# Altium PCB LoRaWAN_v2.0.PcbDoc
Units mm, origin at the board's own origin, x right, y up, seen from the top; angles counter-clockwise.
Board outline 33 x 53 mm, 2 copper layers (Top Layer, Bottom Layer), stack 0.97 mm thick; 7 components, 16 nets, 83 pads, 59 vias.
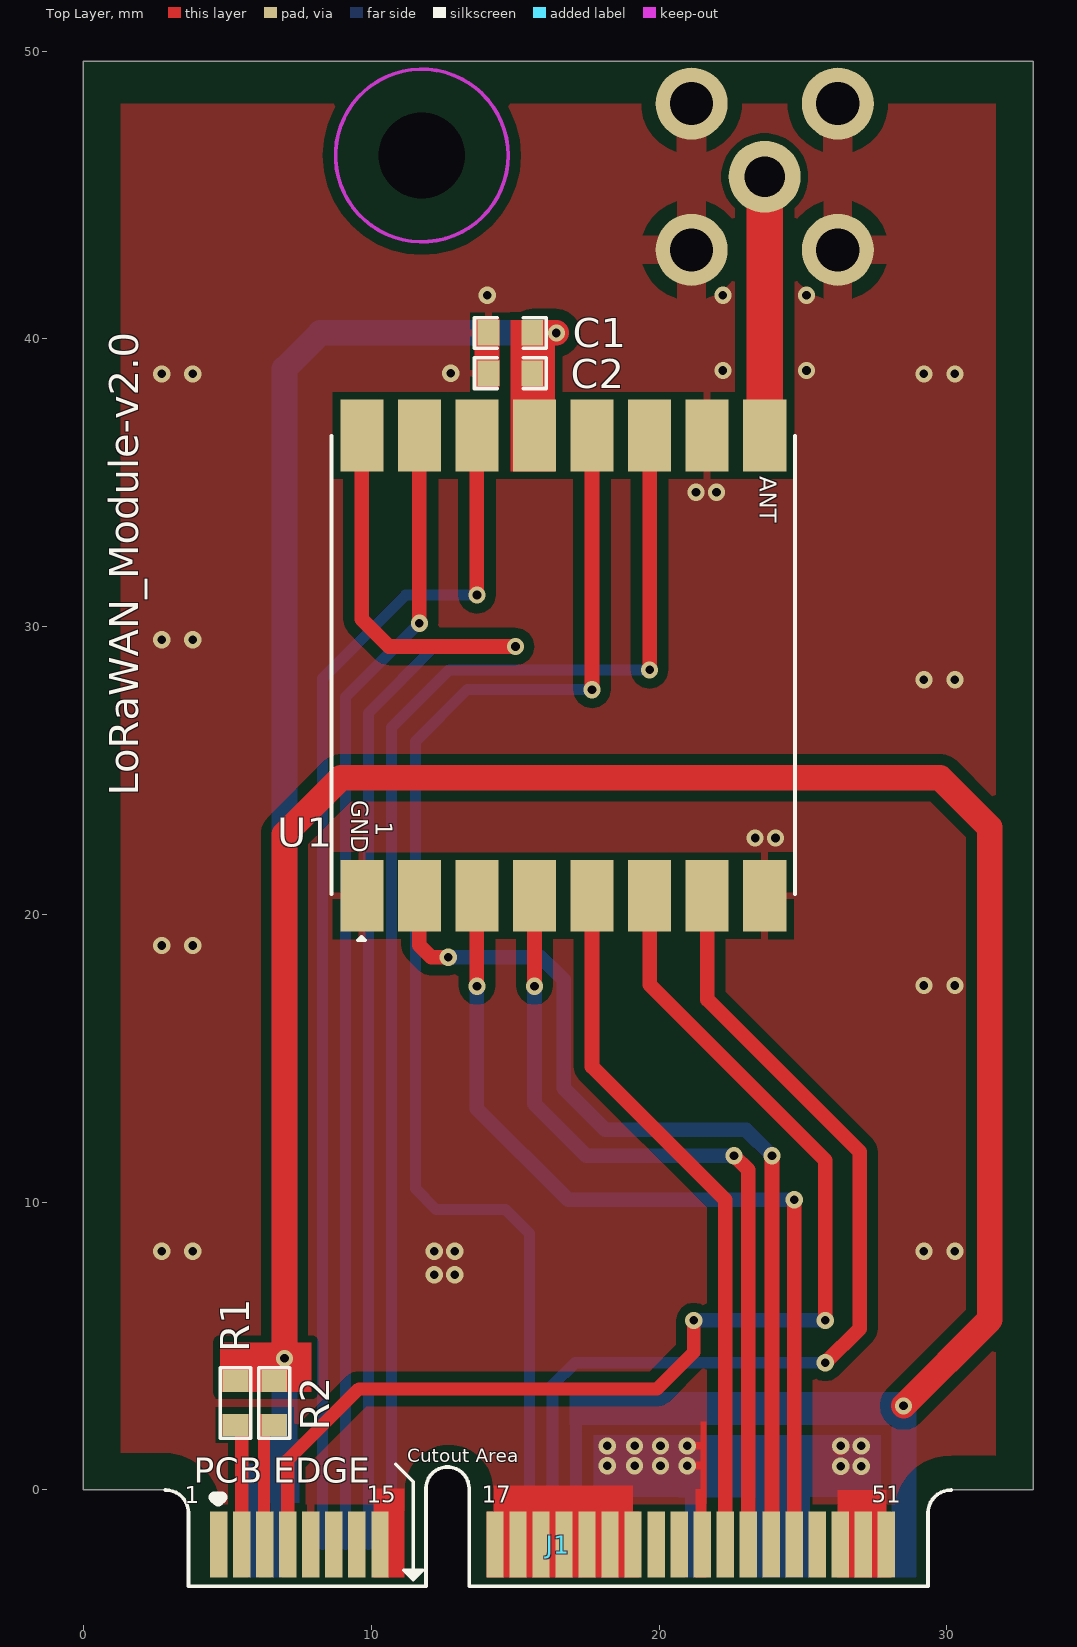
[diagram p0: Top Layer view]
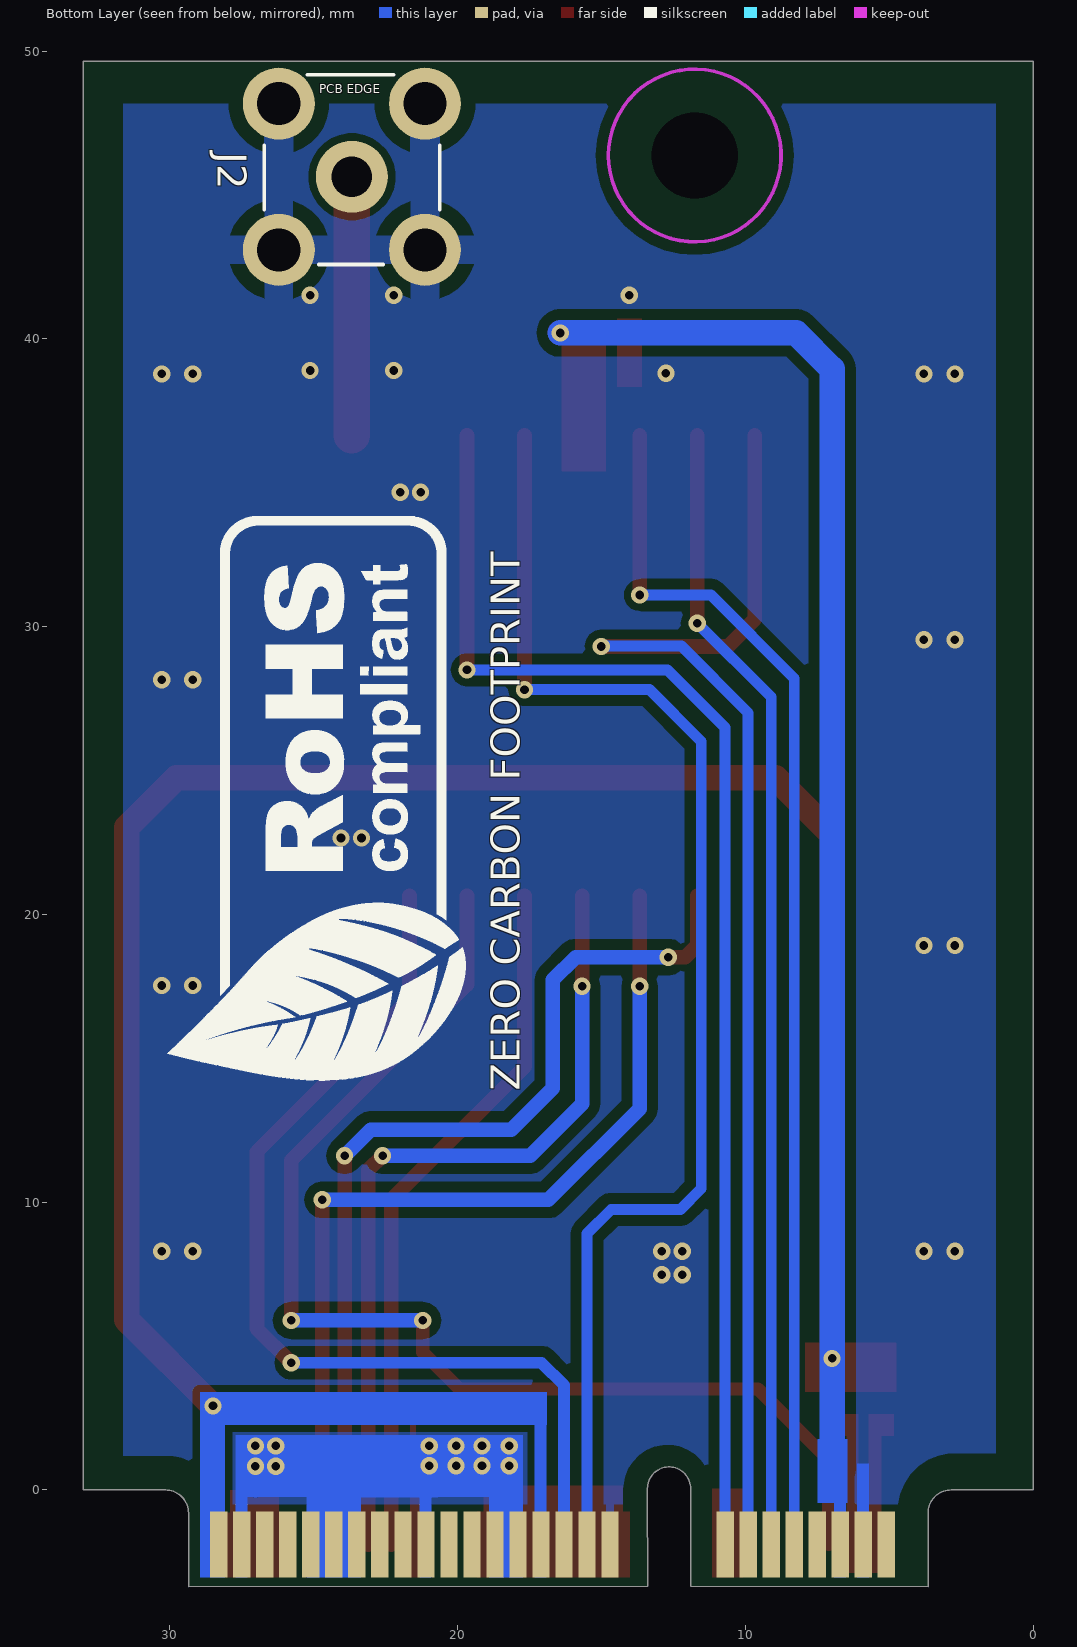
[diagram p1: Bottom Layer view, seen from below]
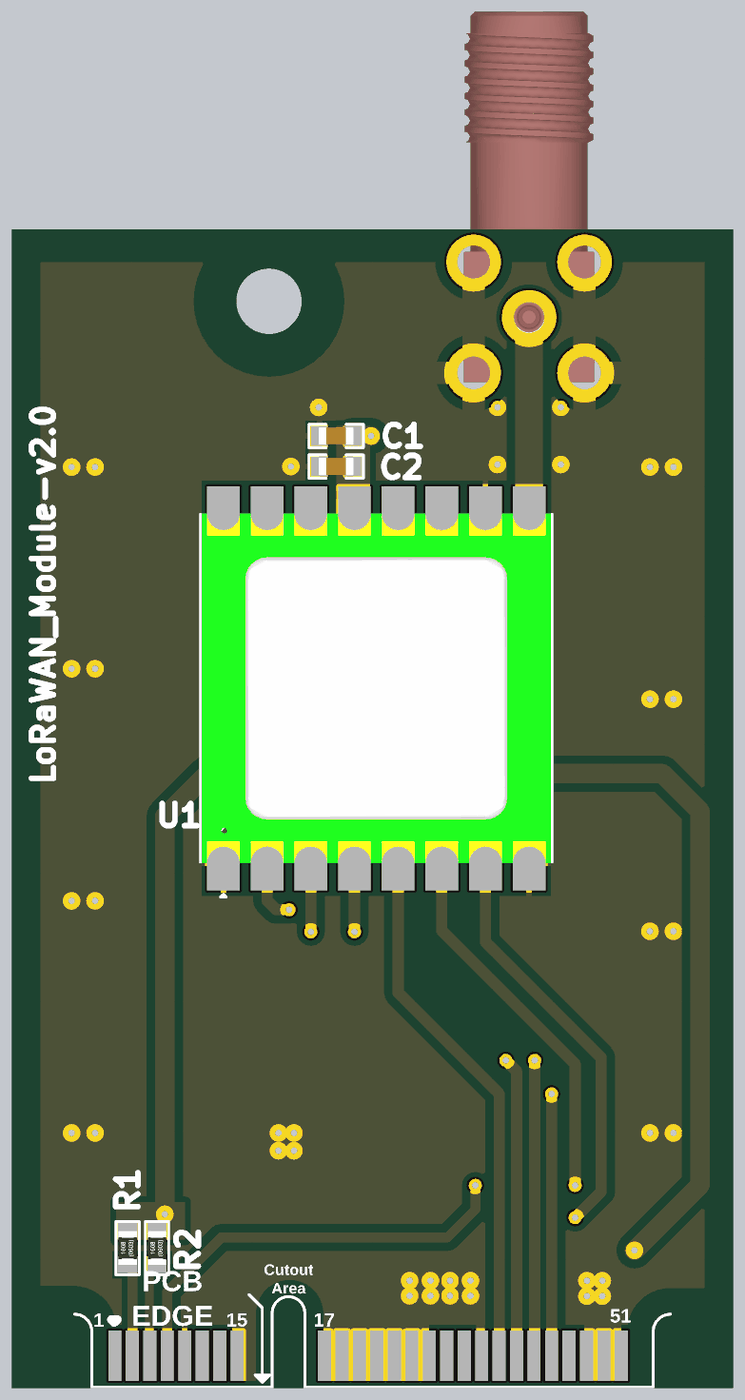
[diagram p2: 3D render of the assembled board from above, using the file's embedded part models]

## Layer stack, top to bottom
Top Solder: solder mask 0.015, Solder Resist, Dk 3.5
Top Layer: signal copper 0.035
Dielectric 1: core 0.9, FR-4, Dk 4.8
Bottom Layer: signal copper 0.035
Bottom Solder: solder mask 0.015, Solder Resist, Dk 3.5

## Board outline
3.65,-3.355 3.65,-0.8 ccw(c2.85,-0.8) 2.85,0 0,0 0,49.642 33,49.642 33,0 30.15,0 ccw(c30.15,-0.8) 29.35,-0.8 29.35,-3.355 13.399,-3.35 13.399,-3.349 13.401,0.051 ccw(c12.651,0.051) 11.901,0.051 11.899,-3.349 11.899,-3.35

## Design rules (kind name [scope] priority, off if disabled: settings)
Clearance [All] p1: gap=0.178 ignorepadtopadclearanceinfootprint=FALSE except(0: Arc-Hole Track-Hole SMDPad-Hole THPad-Hole Via-Hole Fill-Hole Poly-Hole Region-Hole Text-Hole; 0.102: Arc-SMDPad Track-SMDPad SMDPad-SMDPad; 0.254: SMDPad-Fill SMDPad-Poly SMDPad-Region THPad-Fill THPad-Poly THPad-Region Via-Fill Via-Poly Via-Region Fill-Fill Fill-Poly Fill-Region Poly-Poly Poly-Region Region-Region; 0.381: Arc-Fill Arc-Poly Arc-Region Track-Fill Track-Poly Track-Region)
ComponentClearance [All] p1: gap=0 collisioncheckmode=3 verticalgap=0 showdistances=FALSE
HoleSize [All] p1: absolutevalues=TRUE maxlimit=5 minlimit=0.025 maxpercent=80.000 minpercent=20.000
HoleToHoleClearance [All] p1: gap=0 allowstackedmicrovias=TRUE
MinimumSolderMaskSliver [All] p1: minsoldermaskwidth=0
PolygonConnect [All] p1: thpad.connectstyle=Relief thpad.reliefconductorwidth=1.016 thpad.reliefentries=4 thpad.polygonreliefangle="90 Angle" thpad.airgapwidth=0.508 smdpad.connectstyle=Relief smdpad.reliefconductorwidth=0.254 smdpad.reliefentries=4 smdpad.polygonreliefangle="90 Angle" smdpad.airgapwidth=0.254 via.connectstyle=Direct via.reliefconductorwidth=0.254 via.reliefentries=4 via.polygonreliefangle="90 Angle" via.airgapwidth=0.254
RoutingVias [All] p1: holewidth=0.3 width=0.6 viastyle="Through Hole" minholewidth=0.3 minwidth=0.6 maxholewidth=0.3 maxwidth=0.6
SilkToSilkClearance [All] p1: silktosilkclearance=0
SilkToSolderMaskClearance [IsPad] p1: minsilkscreentomaskgap=0 clearancetoexposedcopper=TRUE
SolderMaskExpansion [All] p1: expansion=0.102 istentingtop=FALSE
Width [All] p1: maxlimit=1.524 minlimit=0.254 preferedwidth=1.016 minimp=50.000000 maximp=50.000000 favimp=50.000000
24 further rules are at their usual default settings.

## Components (designator, comment, footprint, x,y, rotation, side; value= is the part's Value field where it differs from the comment)
C1 "1uF" Cap-0603 14.834,40.208 r0 top locked
C2 "0.1uF" Cap-0603 14.834,38.811 r180 top locked
J1 "Mini PCIe" "Mini PCIE Pad" 4.7,-1.9 r0 top locked
J2 "HJ-SMA175" HJ-SMA175 23.673,45.637 r270 bottom
R1 "0R" Res-0603 5.283,3.023 r270 top
R2 "0R" Res-0603 6.629,3.023 r270 top
U1 "SX1276S8S+T-X1" SX1276S8S+T-X1 16.673,28.651 r270 top locked

## Footprints (in the part's own frame and the unit in brackets; to place one, negate y for a bottom-side part, rotate by r counter-clockwise, add the part's x,y. Pads: shape width x height; smd on the part's side, far side on the other; paste and mask are expansions set on the pad)
Cap-0603 [mil]
  rect 30x35 smd mask+2.36: 1(-30,0) 2(30,0)
  silkscreen extent -49,-21 49,21, body extent -32,-16 31,16, height 34
HJ-SMA175 [mm]
  round 2.5 hole 1.4: 1(0,0)
  round 2.5 hole 1.5: 2(-2.54,2.54) 3(-2.54,-2.54) 4(2.54,-2.54) 5(2.54,2.54)
  silkscreen extent -3.54,-3.05 3.05,3.05, body extent -14.01,-3 2.99,3, height 6.4
"Mini PCIE Pad" [mm]
  rect 0.6x2.3 smd: 1(0,0) 3(0.8,0) 5(1.6,0) 7(2.4,0) 9(3.2,0) 11(4,0) 13(4.8,0) 15(5.6,0) 17(9.6,0) 19(10.4,0) 21(11.2,0) 23(12,0) 25(12.8,0) 27(13.6,0) 29(14.4,0) 31(15.2,0) 33(16,0) 35(16.8,0) 37(17.6,0) 39(18.4,0) 41(19.2,0) 43(20,0) 45(20.8,0) 47(21.6,0) 49(22.4,0) 51(23.2,0)
  rect 0.6x2.3 smd far side: 2(0.4,0) 4(1.2,0) 6(2,0) 8(2.8,0) 10(3.6,0) 12(4.4,0) 14(5.2,0) 16(6,0) 18(10,0) 20(10.8,0) 22(11.6,0) 24(12.4,0) 26(13.2,0) 28(14,0) 30(14.8,0) 32(15.6,0) 34(16.4,0) 36(17.2,0) 38(18,0) 40(18.8,0) 42(19.6,0) 44(20.4,0) 46(21.2,0) 48(22,0) 50(22.8,0) 52(23.6,0)
  silkscreen extent -1.85,-1.45 25.45,2.79
Res-0603 [mil]
  rect 30x35 smd: 1(-30,0) 2(30,0)
  silkscreen extent -48,-21 48,21, body extent -31,-17 31,17, height 18
SX1276S8S+T-X1 [mm]
  rect 2.5x1.5 smd: 1(8,-7) 2(8,-5) 3(8,-3) 4(8,-1) 5(8,1) 6(8,3) 7(8,5) 8(8,7) 8(8,7) 9(-8,7) 10(-8,5) 11(-8,3) 12(-8,1) 13(-8,-1) 14(-8,-3) 15(-8,-5) 16(-8,-7)
  silkscreen extent -7.98,-8.05 9.55,8.05, body extent -8,-8 8,8, height 4

## Part data
C1: library part CC0603KRX5R8BB105, "CAP CER 1UF 25V X5R 0603", Case Code (Imperial)=0603, Case Code (Metric)=1608, Dielectric=X5R, LCSC Part Number=C14664, Manufacturer=Yageo, Max Operating Temperature=85°C, Min Operating Temperature=-55°C, Package Quantity=1, Supplier Part Number 1=311-1445-1-ND, Tolerance=10%, Voltage Rating=25V, Capacitance=1uF, Case/Package=0603, Category="Ceramic Capacitors", ComponentLink1Description=https://datasheet.ciiva.com/176/mlccorderingcode-176785.pdf?src-supplier=Digi-Key, ComponentLink1URL=https://datasheet.ciiva.com/176/mlccorderingcode-176785.pdf?src-supplier=Digi-Key, ComponentLink2Description=https://datasheet.ciiva.com/176/mlccorderingcode-176786.pdf?src-supplier=Digi-Key, ComponentLink2URL=https://datasheet.ciiva.com/176/mlccorderingcode-176786.pdf?src-supplier=Digi-Key, ComponentLink3Description=https://datasheet.ciiva.com/176/mlccorderingcode-176787.pdf?src-supplier=Digi-Key, ComponentLink3URL=https://datasheet.ciiva.com/176/mlccorderingcode-176787.pdf?src-supplier=Digi-Key, ComponentLink4Description=https://datasheet.ciiva.com/17436/upy-gphc-x5r-4v-to-50v-12-17436952.pdf?src-supplier=Avnet+Europe, ComponentLink4URL=https://datasheet.ciiva.com/17436/upy-gphc-x5r-4v-to-50v-12-17436952.pdf?src-supplier=Avnet+Europe, ComponentLink5Description=https://datasheet.ciiva.com/7978/1525783-7978171.pdf?src-supplier=Element14, ComponentLink5URL=https://datasheet.ciiva.com/7978/1525783-7978171.pdf?src-supplier=Element14, ComponentLink6Description=https://datasheet.ciiva.com/11586/upy-gphc-x5r-4v-to-50v-12-11586318.pdf?src-supplier=Avnet, ComponentLink6URL=https://datasheet.ciiva.com/11586/upy-gphc-x5r-4v-to-50v-12-11586318.pdf?src-supplier=Avnet, Construction=Flat, Depth=0.8mm, Halogen Free="Halogen Free", Height=0.8mm, Lead Free="Lead Free", Length=1.6mm, Manufacturer Part Number=CC0603KRX5R8BB105, Mount="Surface Mount", Number of Pins=2, Packaging="Tape and Reel", Pricing 1="1=0.12000, 10=0.08400, 50=0.04760, 100=0.03940, 500=0.02764, 1000=0.02288 (USD)", Radiation Hardening=No, REACH SVHC="No SVHC", RoHS=Yes, RoHS Compliant=Yes, Series=CC, Stock 1=919939, Supplier 1=Digi-Key, Termination=SMD/SMT, Thickness=0.035inch, Voltage Rating (DC)=25V, Width=0.031inch
C2: library part CC0603KRX5R9BB104, "CAP CER 0.1UF 50V X5R 0603", Capacitance=100nF, Case Code (Imperial)=0603, Case Code (Metric)=1608, Dielectric=X5R, LCSC Part Number=C110022, Manufacturer=Yageo, Max Operating Temperature=85°C, Min Operating Temperature=-55°C, Package Quantity=4000, Supplier Part Number 1=311-4046-1-ND, Tolerance=10%, Voltage Rating=50V, Case/Package=0603, Category="Ceramic Capacitors", ComponentLink1Description=http://www.mouser.com/ds/2/447/Yageo_UPY-GP_NP0_16V-to-50V_9-358835.pdf?src-supplier=Mouser, ComponentLink1URL=http://www.mouser.com/ds/2/447/Yageo_UPY-GP_NP0_16V-to-50V_9-358835.pdf?src-supplier=Mouser, ComponentLink2Description=https://www.yageo.com/upload/media/product/productsearch/datasheet/mlcc/UPY-GPHC_X5R_4V-to-50V_26.pdf?src-supplier=Digi-Key, ComponentLink2URL=https://www.yageo.com/upload/media/product/productsearch/datasheet/mlcc/UPY-GPHC_X5R_4V-to-50V_26.pdf?src-supplier=Digi-Key, ComponentLink3Description=http://www.yageo.com/exep/pages/download/literatures/ProductSelectionGuide%202014_Final_2.pdf?src-supplier=Digi-Key, ComponentLink3URL=http://www.yageo.com/exep/pages/download/literatures/ProductSelectionGuide%202014_Final_2.pdf?src-supplier=Digi-Key, Halogen Free="Halogen Free", Item Type=Capacitor, Lead Free="Lead Free", Length=0.063inch, Manufacturer Part Number=CC0603KRX5R9BB104, Mount="Surface Mount", Packaging="Tape and Reel", Pricing 1="1=0.10000, 10=0.05200, 50=0.02820, 100=0.02310, 500=0.01648, 1000=0.01294 (USD)", RoHS=Yes, Stock 1=152253, Supplier 1=Digi-Key, Termination=SMD/SMT, Thickness=0.035inch, Voltage Rating (DC)=50V, Weight=7.1E-05oz, Width=0.031inch
J1: "PCI Express Mini Card (Mini PCIe)"
J2: "1 Inner bore SMA Board Edge Bend 11mm 5.35mm Plugin RF Connectors / Coaxial Connectors ROHS", LCSC Part Number=C1509213, Manufacturer="HJ Tech", Package=Plugin, ComponentLink1Description=LCSC, ComponentLink1URL=https://www.lcsc.com/product-detail/RF-Connectors-Coaxial-Connectors_HJ-Tech-HJ-SMA175_C1509213.html, Item Type="SMA Connector", Manufacturer Part Number=HJ-SMA175
R1 R2: library part RC0603FR-070RL, "RES SMD 0R, 1%, 0.1W, 0603", LCSC Part Number=C100044, Manufacturer=Yageo, Package=0603, ComponentLink9Description=LCSC, ComponentLink9URL=https://www.lcsc.com/product-detail/Chip-Resistor-Surface-Mount_YAGEO-RC0603FR-070RL_C100044.html, Item Type=Resistor, Manufacturer Part Number=RC0603FR-070RL
U1: "SMD,16x16mm LoRa Modules ROHS", LCSC Part Number=C718834, Manufacturer=Vollgo, Package=SMD,16x16mm, ComponentLink1Description=LCSC, ComponentLink1URL=https://www.lcsc.com/product-detail/LoRa-Modules_Vollgo-SX1276S8S-T-X1_C718834.html, Item Type=Module, Manufacturer Part Number=SX1276S8S+T-X1

## Free pads (board coordinates)
  round 0 hole 3 unplated: MH(11.759,46.376)

## Via types
v1: diameter 0.6, hole 0.3, Top Layer to Bottom Layer, 59 vias

## Nets (pads, with @x,y where several pads share a name; then routed paths per layer and width w, separated by ;. In a path a pad name is that pad's centre, name@x,y a point inside that pad or via, vN(x,y) a via of type N, cw(c..) or ccw(c..) an arc to the next point about the centre after c; other vN are vias at no path point)
3V3: C1.2 C2.1 J1.6 J1.24 J1.52 R1.1 R2.1 U1.13 | length 114.6
  Top Layer w0.889: v1(6.985,4.572) 6.985,22.79 8.942,24.747 29.774,24.747 31.496,23.024 31.496,5.918 v1(28.499,2.921) ; C1.2 v1(16.434,40.208)
  Bottom Layer w0.889: 6.985,0.716 v1(6.985,4.572) 6.985,38.959 8.234,40.208 v1(16.434,40.208)
GND: C1.1 C2.2 J1.4 J1.9 J1.15 J1.17 J1.18 J1.19 J1.21 J1.23 J1.25 J1.26 J1.27 J1.28 J1.29 J1.34 J1.35 J1.40 J1.42 J1.44 J1.47 J1.49 J1.50 J1.51 J2.2 J2.3 J2.4 J2.5 U1.1 U1.8 U1.10 | length 8.2
  Top Layer w0.559: J1.27@18.2,-1.8 J1.27 ; v1@26.3,1.5 26.319,1.52 v1(26.319,1.531)
  Bottom Layer w0.559: 20.752,0.025 24.302,0.025 25.807,1.531 v1(26.319,1.531) v1(27.026,0.825) 27.026,0.025
  other v1: 26.319,0.825 18.2,0.838 19.152,0.838 20.051,0.838 20.986,0.838 18.2,1.531 19.152,1.531 20.051,1.531 20.986,1.531 27.026,1.531 12.192,7.483 12.903,7.483 2.718,8.295 3.794,8.295 12.192,8.295 12.903,8.295 29.206,8.295 30.282,8.295 29.206,17.531 30.282,17.531 2.718,18.923 3.794,18.923 23.339,22.656 24.05,22.656 29.206,28.158 30.282,28.158 2.718,29.551 3.794,29.551 21.285,34.671 21.996,34.671 2.718,38.786 3.794,38.786 29.206,38.786 30.282,38.786 12.761,38.812 22.221,38.902 25.125,38.902 14.034,41.519 22.221,41.523 25.125,41.523
LORA_IO0: J1.10 U1.14 | length 42.1
  Top Layer w0.508: v1(13.673,31.1) U1.14
  Bottom Layer w0.381: J1.10 8.3,25.944 8.3,28.203 11.197,31.1 v1@13.571,31.1
LORA_IO1: J1.12 U1.15 | length 39.6
  Top Layer w0.508: v1(11.673,30.124) U1.15
  Bottom Layer w0.381: J1.12 9.1,25.612 9.1,27.552 v1(11.673,30.124)
LORA_IO2: J1.14 U1.16 | length 47.1
  Top Layer w0.508: U1.16 9.673,30.256 10.617,29.312 v1(15.011,29.312)
  Bottom Layer w0.381: J1.14 9.9,27.006 12.218,29.324 v1@15.011,29.324
LORA_IO3: J1.16 U1.11 | length 46.4
  Top Layer w0.508: v1(19.673,28.499) U1.11
  Bottom Layer w0.381: J1.16 10.7,26.5 12.698,28.499 v1(19.673,28.499)
LORA_IO4: J1.20 U1.12 | length 46.7
  Top Layer w0.508: v1(17.673,27.813) U1.12
  Bottom Layer w0.381: J1.20 15.5,8.913 14.66,9.754 12.249,9.754 11.532,10.471 11.532,26.008 13.337,27.813 v1(17.673,27.813)
LORA_IO5: J1.22 U1.7 | length 34.3
  Top Layer w0.508: U1.7 21.673,17.045 26.971,11.747 26.971,5.61 v1(25.781,4.42)
  Bottom Layer w0.406: J1.22 16.3,3.635 17.085,4.42 v1(25.781,4.42)
LORA_NSS: J1.37 U1.5 | length 24.5
  Top Layer w0.508: U1.5 17.673,14.713 22.3,10.086 J1.37
LORA_RST: J1.7 U1.6 | length 41.6
  Top Layer w0.457: J1.7 7.1,1.042 9.571,3.513 19.935,3.513 21.209,4.787 v1(21.209,5.893)
  Top Layer w0.508: U1.6 19.673,17.564 25.781,11.456 v1(25.781,5.893)
  Bottom Layer w0.508: v1(21.209,5.893) v1(25.781,5.893)
LORA_SCK: J1.39 U1.4 | length 28.6
  Top Layer w0.508: v1(15.673,17.503) U1.4 ; v1(22.606,11.619) 23.1,11.125 J1.39
  Bottom Layer w0.508: v1(15.673,17.503) 15.673,13.422 17.476,11.619 v1(22.606,11.619)
LORA_SI: J1.43 U1.3 | length 31.7
  Top Layer w0.508: v1(13.673,17.503) U1.3 ; J1.43 v1(24.7,10.084)
  Bottom Layer w0.508: v1(13.673,17.503) 13.673,13.254 16.843,10.084 v1(24.7,10.084)
LORA_SO: J1.41 U1.2 | length 32.7
  Top Layer w0.508: U1.2 11.673,18.928 12.084,18.517 v1(12.675,18.517) ; J1.41@23.927,-1.873 v1(23.927,11.619)
  Bottom Layer w0.508: v1(12.675,18.517) 15.896,18.517 16.688,17.725 16.688,13.964 18.128,12.524 23.022,12.524 v1(23.927,11.619)
NetJ2_1: J2.1 U1.9 | length 9
  Top Layer w1.27: U1.9 J2.1
TYPE0: J1.3 R1.2
TYPE1: J1.5 R2.2
pads on no net: J1.1 J1.2 J1.8 J1.11 J1.13 J1.30 J1.31 J1.32 J1.33 J1.36 J1.38 J1.45 J1.46 J1.48

## Polygon pours and split planes (outlines as drawn)
GND on Top Layer "GND_L01_P000" (solid, remove dead copper, pour order 0): 1.295,1.295 2.85,1.295 cw(c2.801,-0.687) 4.784,-0.737 11.161,-0.815 11.161,0.051 cw(c12.706,0.025) 14.252,0 14.252,-0.8 15.926,-0.737 28.169,-0.737 cw(c30.126,-0.761) 30.15,1.197 31.699,1.197 31.699,48.177 1.295,48.177
GND on Bottom Layer "GND_L02_P002" (solid, remove dead copper, pour order 2): 1.295,1.28 2.708,1.28 cw(c2.708,-0.735) 4.723,-0.736 11.161,-0.815 11.161,0.051 cw(c12.706,0.025) 14.252,0 14.252,-0.8 15.926,-0.737 28.169,-0.737 cw(c30.126,-0.761) 30.15,1.197 31.623,1.197 31.623,48.177 1.295,48.177

## Keep-outs
Keep-Out Layer:
  circle w0.127: c11.759,46.376 r3

## Other copper
Top Layer:
  rectangle net 3V3: 4.75,3.404 7.925,5.126
  rectangle net TYPE1: 6.073,1.88 6.833,2.642
  rectangle net TYPE0: 4.839,1.88 5.728,2.642
  rectangle net GND: 20.986,0.711 21.648,0.983
  rectangle net GND: 20.986,1.404 21.648,1.676
  rectangle net GND: 21.447,-0.496 21.653,2.388
  rectangle net GND: 26.2,-2.788 27.9,0
  rectangle net GND: 10.073,-3.05 11.161,0.051
  rectangle net TYPE1: 6.073,-2.881 6.477,2.642
  rectangle net TYPE0: 5.273,-2.881 5.728,2.642
  rectangle net GND: 14.252,-3.05 19.1,0.152
  region net GND: 21.648,0.025 21.26,0.025 21.26,-3.048 21.648,-3.048
  rectangle net GND: 26.187,-3.048 28.067,-0.787
  rectangle net GND: 14,-3.05 19.329,-0.75
  rectangle net GND: 13.589,38.329 14.453,40.716
  rectangle net 3V3: 14.834,35.401 16.383,40.665
Bottom Layer:
  rectangle net 3V3: 16.897,2.261 28.55,3.404
  rectangle net 3V3: 6.452,-0.448 7.5,1.778
  rectangle net 3V3: 6.502,-3.048 6.923,0.914
  rectangle net GND: 5.702,-3.048 6.123,0.914
  rectangle net GND: 20.902,-3.048 21.323,1.168
  rectangle net GND: 23.352,-3.048 25.251,1.168
  rectangle net GND: 27.302,-3.048 27.723,1.168
  rectangle net 3V3: 16.902,-3.048 17.323,3.361
  rectangle net GND: 17.727,-3.05 18.902,1.168
  rectangle net GND: 17.727,-0.251 27.711,1.91
  rectangle net 3V3: 28.076,-3.048 28.956,3.404
  rectangle net GND: 23.393,-3.023 25.248,-0.787
  rectangle net GND: 17.831,-3.048 18.7,-0.787

## Silkscreen, mask and mechanical layers (free items; w line width, h text height)
Top Overlay:
  text "LoRaWAN_Module-v2.0" at 1.905,24.13 h1.02 r90
Bottom Overlay:
  drawing of 16 lines, arcs and shapes, not listed
  text "ZERO CARBON FOOTPRINT" at 17.838,13.878 h1.02 r270
Board Outline:
  the board outline again, w0.127
Fabrication:
  drawing of 191 lines, arcs and shapes, not listed
  text "Layer" at 41.766,61.824 h1.52
  text "Name" at 52.178,61.824 h1.52
  text "Material" at 75.794,61.824 h1.52
  text "Thickness" at 97.632,61.824 h1.52
  text "Constant" at 114.137,61.824 h1.52
  text "Board Layer Stack" at 128.612,61.824 h1.52
  text "Top Overlay" at 52.178,58.776 h1.52
  text "Top Solder" at 52.178,55.728 h1.52
  text "Solder Resist" at 75.794,55.728 h1.52
  text "0.59mil" at 97.632,55.728 h1.52
  text "3.5" at 114.137,55.728 h1.52
  text "1" at 41.766,52.68 h1.52
  text "Top Layer" at 52.178,52.68 h1.52
  text "1.38mil" at 97.632,52.68 h1.52
  text "Dielectric 1" at 52.178,49.632 h1.52
  text "FR-4" at 75.794,49.632 h1.52
  text "35.43mil" at 97.632,49.632 h1.52
  text "4.8" at 114.137,49.632 h1.52
  text "2" at 41.766,46.584 h1.52
  text "Bottom Layer" at 52.178,46.584 h1.52
  text "1.38mil" at 97.632,46.584 h1.52
  text "Bottom Solder" at 52.178,43.536 h1.52
  text "Solder Resist" at 75.794,43.536 h1.52
  text "0.59mil" at 97.632,43.536 h1.52
  text "3.5" at 114.137,43.536 h1.52
  text "Bottom Overlay" at 52.178,40.488 h1.52
Drill Drawing:
  circle w0.254: c2.429,83.028 r0.847
  lines w0.254: 1.582,71.175 2.006,71.175 2.429,70.752 2.852,71.175 3.276,71.175 2.852,71.598 3.276,72.022 2.852,72.022 2.429,72.445 2.006,72.022 1.582,72.022 2.006,71.598 1.582,71.175 ; 1.582,76.255 3.276,76.255 2.429,74.562 1.582,76.255 ; 1.582,78.372 2.429,78.795 3.276,78.372 2.852,79.218 3.276,80.065 2.429,79.642 1.582,80.065 2.006,79.218 1.582,78.372
  lines w0.381: 0.064,69.609 323.265,69.609 ; 0.064,84.849 323.265,84.849 ; 14.056,65.799 14.056,88.659 ; 27.768,65.799 27.768,88.659 ; 56.208,65.799 56.208,88.659 ; 69.057,65.799 69.057,88.659 ; 87.696,65.799 87.696,88.659 ; 125.784,65.799 125.784,88.659 ; 140.766,65.799 140.766,88.659 ; 159.71,65.799 159.71,88.659 ; 176.215,65.799 176.215,88.659 ; 197.901,65.799 197.901,88.659 ; 231.775,65.799 231.775,88.659 ; 265.648,65.799 265.648,88.659 ; 287.639,65.799 287.639,88.659 ; 0.064,65.799 323.265,65.799 323.265,88.659 0.064,88.659 0.064,65.799
  text "Symbol" at 2.349,85.992 h1.83
  text "Count" at 15.199,85.992 h1.83
  text "Hole Size" at 28.911,85.992 h1.83
  text "Plated" at 57.351,85.992 h1.83
  text "Hole Type" at 70.2,85.992 h1.83
  text "Drill Layer Pair" at 88.839,85.992 h1.83
  text "Via/Pad" at 126.927,85.992 h1.83
  text "Pad Shape" at 141.909,85.992 h1.83
  text "Template" at 160.853,85.992 h1.83
  text "Description" at 177.358,85.992 h1.83
  text "Hole Tolerance (+)" at 199.044,85.992 h1.83
  text "Hole Tolerance (-)" at 232.918,85.992 h1.83
  text "Hole Length" at 266.791,85.992 h1.83
  text "Routed Path Length" at 288.782,85.992 h1.83
  text "1" at 15.199,82.182 h1.52
  text "1.400mm (55.12mil)" at 28.911,82.182 h1.52
  text "PTH" at 57.351,82.182 h1.52
  text "Round" at 70.2,82.182 h1.52
  text "Top Layer - Bottom Layer" at 88.839,82.182 h1.52
  text "Pad" at 126.927,82.182 h1.52
  text "Rounded" at 141.909,82.182 h1.52
  text "c250h140" at 160.853,82.182 h1.52
  text "-" at 266.791,82.182 h1.52
  text "-" at 288.782,82.182 h1.52
  text "1" at 15.199,78.372 h1.52
  text "3.000mm (118.11mil)" at 28.911,78.372 h1.52
  text "NPTH" at 57.351,78.372 h1.52
  text "Round" at 70.2,78.372 h1.52
  text "Top Layer - Bottom Layer" at 88.839,78.372 h1.52
  text "Pad" at 126.927,78.372 h1.52
  text "Rounded" at 141.909,78.372 h1.52
  text "c0hn300" at 160.853,78.372 h1.52
  text "-" at 266.791,78.372 h1.52
  text "-" at 288.782,78.372 h1.52
  text "4" at 15.199,74.562 h1.52
  text "1.500mm (59.06mil)" at 28.911,74.562 h1.52
  text "PTH" at 57.351,74.562 h1.52
  text "Round" at 70.2,74.562 h1.52
  text "Top Layer - Bottom Layer" at 88.839,74.562 h1.52
  text "Pad" at 126.927,74.562 h1.52
  text "Rounded" at 141.909,74.562 h1.52
  text "c250h150" at 160.853,74.562 h1.52
  text "-" at 266.791,74.562 h1.52
  text "-" at 288.782,74.562 h1.52
  text "59" at 15.199,70.752 h1.52
  text "0.300mm (11.81mil)" at 28.911,70.752 h1.52
  text "PTH" at 57.351,70.752 h1.52
  text "Round" at 70.2,70.752 h1.52
  text "Top Layer - Bottom Layer" at 88.839,70.752 h1.52
  text "Via" at 126.927,70.752 h1.52
  text "Rounded" at 141.909,70.752 h1.52
  text "v60h30" at 160.853,70.752 h1.52
  text "-" at 266.791,70.752 h1.52
  text "-" at 288.782,70.752 h1.52
  text "65 Total" at 15.199,66.942 h1.52

## Dimensions
33,49.642 to 29.35,-3.355 on Dimensions
0,49.642 to 33,49.642 on Dimensions

## Text inside footprints (layer, text, board x,y; h text height)
J1: Top Overlay "15" at 9.839,-0.642 h1; Top Overlay "1" at 3.515,-0.653 h1; Top Overlay "17" at 13.839,-0.642 h1; Top Overlay "Cutout Area" at 11.245,0.803 h0.8; Top Overlay "PCB EDGE" at 3.837,-0.049 h1.5; Top Overlay "51" at 27.395,-0.642 h1
J2: Bottom Overlay "PCB EDGE" at 24.807,48.541 h0.3
U1: Top Overlay "GND" at 9.114,23.978 h1 r270; Top Overlay "ANT" at 23.314,35.232 h1 r270; Top Overlay "1" at 9.967,23.216 h1 r270